# Altium PCB smd-dip converter.PcbDoc
Units mil, origin at the board's own origin, x right, y up, seen from the top; angles counter-clockwise.
Board outline 675 x 800 mil, 2 copper layers (Top Layer, Bottom Layer); 1 components, 0 nets, 32 pads, 0 vias.
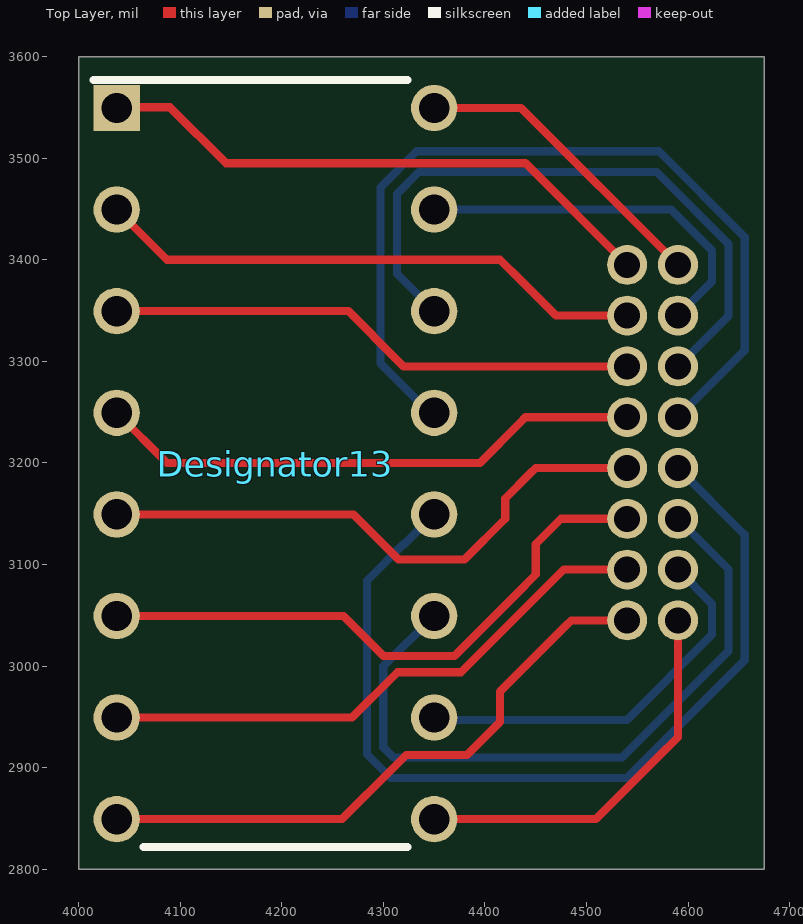
[diagram p0: Top Layer view]
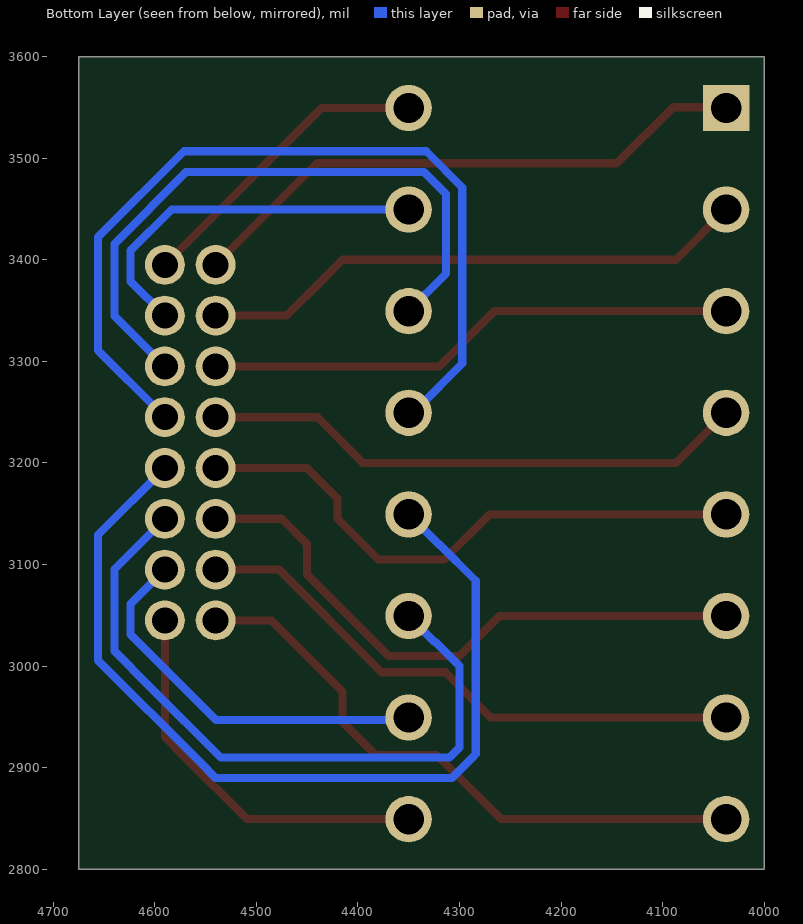
[diagram p1: Bottom Layer view, seen from below]

## Layer stack, top to bottom
Top Solder: solder mask 0.4, Solder Resist, Dk 3.5
Top Layer: signal copper 1.4
Dielectric 1: dielectric 12.6, FR-4, Dk 4.8
Bottom Layer: signal copper 1.4
Bottom Solder: solder mask 0.4, Solder Resist, Dk 3.5

## Board outline
4000,2800 4675,2800 4675,3600 4000,3600

## Design rules (kind name [scope] priority, off if disabled: settings)
BoardOutlineClearance [All] p1: gap=10 ignorepadtopadclearanceinfootprint=FALSE except(0: Arc-SplitContinuation Track-SplitContinuation SMDPad-SplitContinuation THPad-SplitContinuation Via-SplitContinuation Fill-SplitContinuation Poly-SplitContinuation Region-SplitContinuation Text-SplitContinuation)
Clearance [All] p1: gap=10 ignorepadtopadclearanceinfootprint=FALSE except(8: Arc-Arc Arc-Track Arc-SMDPad Arc-Fill Arc-Poly Arc-Region Track-Track Track-SMDPad Track-Fill Track-Poly Track-Region SMDPad-SMDPad SMDPad-Fill SMDPad-Poly SMDPad-Region)
PolygonConnect [All] p1: thpad.connectstyle=Relief thpad.reliefconductorwidth=10 thpad.reliefentries=4 thpad.polygonreliefangle="90 Angle" thpad.airgapwidth=10 smdpad.connectstyle=Relief smdpad.reliefconductorwidth=10 smdpad.reliefentries=4 smdpad.polygonreliefangle="90 Angle" smdpad.airgapwidth=10 via.connectstyle=Direct via.reliefconductorwidth=10 via.reliefentries=4 via.polygonreliefangle="90 Angle" via.airgapwidth=10
RoutingVias [All] p1: holewidth=12 width=24 viastyle="Through Hole" minholewidth=12 minwidth=24 maxholewidth=12 maxwidth=24
SolderMaskExpansion [All] p1: expansion=4 istentingtop=FALSE
Width [All] p1: maxlimit=25 minlimit=8 preferedwidth=8
30 further rules are at their usual default settings.

## Components (designator, comment, footprint, x,y, rotation, side; value= is the part's Value field where it differs from the comment)
Designator13 "Comment" DIP-16 4193.85,3199.35 r0 top

## Footprints (in the part's own frame and the unit in brackets; to place one, negate y for a bottom-side part, rotate by r counter-clockwise, add the part's x,y. Pads: shape width x height; smd on the part's side, far side on the other; paste and mask are expansions set on the pad)
DIP-16 [mil] "Combo footprint for opamps that i have"
  rect 45.63x45.63 hole 29.88: 1(-156.26,350)
  round 45.63 hole 29.88: 2(-156.26,250) 3(-156.26,150) 4(-156.26,50) 5(-156.26,-50) 6(-156.26,-150) 7(-156.26,-250) 8(-156.26,-350) 9(156.26,-350) 10(156.26,-250) 11(156.26,-150) 12(156.26,-50) 13(156.26,50) 14(156.26,150) 15(156.26,250) 16(156.26,350)
  silkscreen extent -179,-377 130,377, body extent -155,-385 155,390, height 207

## Free pads (board coordinates)
  round 39.37 hole 25.59: R51(4540,3045) R51(4540,3095) R51(4540,3145) R51(4540,3195) R51(4540,3245) R51(4540,3295) R51(4540,3345) R51(4540,3395) R51(4590,3045) R51(4590,3095) R51(4590,3145) R51(4590,3195) R51(4590,3245) R51(4590,3295) R51(4590,3345) R51(4590,3395)

## Nets (pads, with @x,y where several pads share a name; then routed paths per layer and width w, separated by ;. In a path a pad name is that pad's centre, name@x,y a point inside that pad or via, vN(x,y) a via of type N, cw(c..) or ccw(c..) an arc to the next point about the centre after c; other vN are vias at no path point)
pads on no net: Designator13.1 Designator13.2 Designator13.3 Designator13.4 Designator13.5 Designator13.6 Designator13.7 Designator13.8 Designator13.9 Designator13.10 Designator13.11 Designator13.12 Designator13.13 Designator13.14 Designator13.15 Designator13.16
copper on no net: | length 9061.5
  Top Layer w8: 4036.94,3550 4090,3550 4145,3495 4440,3495 4540,3395 ; 4037.59,2849.35 4259.35,2849.35 4310,2900 4322.54,2912.54 4382.54,2912.54 4415,2945 4415,2975 4480,3040 4485,3045 4505,3045 4540,3045 ; 4037.59,2949.35 4269.35,2949.35 4310,2990 4314,2994 4376.63,2994 4477.63,3095 4505,3095 4550,3095 ; 4037.59,3049.35 4260.65,3049.35 4300,3010 4370,3010 4430,3070 4450,3090 4450,3120 4475,3145 4505,3145 4540,3145 ; 4037.59,3149.35 4270.65,3149.35 4315,3105 4380,3105 4420,3145 4420,3165 4445,3190 4450,3195 4495,3195 4540,3195 ; 4037.59,3249.35 4086.94,3200 4350,3200 4395,3200 4435,3240 4440,3245 4505,3245 4540,3245 ; 4037.59,3349.35 4265.65,3349.35 4315,3300 4320,3295 4505,3295 4540,3295 ; 4037.59,3449.35 4086.94,3400 4325,3400 4415,3400 4435,3380 4470,3345 4505,3345 4545,3345 ; 4350.11,2849.35 4509.35,2849.35 4570,2910 4590,2930 4590,3000 4590,3045 ; 4350.11,3549.35 4435.65,3549.35 4590,3395
  Top Layer w10: 4036.94,3550 4037.59,3549.35
  Bottom Layer w8: 4341.52,3253.48 4297.3,3297.7 4297.3,3471.23 4332.77,3506.71 4571.18,3506.71 4655.69,3422.21 4655.69,3310.69 4595,3250 4585,3250 4590,3245 ; 4350.11,2949.35 4352.33,2947.14 4539.77,2947.14 4623.69,3031.05 4623.69,3061.31 4590,3095 ; 4350.11,3049.35 4324.46,3023.7 4323.7,3023.7 4300,3000 4300,2945 4300,2920 4310,2910 4535,2910 4605,2980 4639.69,3014.68 4639.69,3095.31 4590,3145 ; 4350.11,3149.35 4320.76,3120 4320,3120 4284,3084 4284,2913.37 4286.19,2911.19 4307.37,2890 4350,2890 4540,2890 4555,2905 4655.69,3005.69 4655.69,3080 4655.69,3129.31 4590,3195 ; 4350.11,3349.35 4313.3,3386.17 4313.3,3396.7 4313.3,3464.6 4334.86,3486.17 4569.1,3486.17 4639.69,3415.58 4639.69,3344.69 4590,3295 ; 4350.11,3449.35 4350.16,3449.41 4583.23,3449.41 4623.69,3408.95 4623.69,3378.69 4590,3345

## Silkscreen, mask and mechanical layers (free items; w line width, h text height)
Board:
  lines w8: 4000,2800 4000,3600 4675,3600 4675,3580 4675,2800 4000,2800